# Altium PCB QuarterBridge_RevK.PcbDoc (part 1 of 2)
Units mil, origin at the board's own origin, x right, y up, seen from the top; angles counter-clockwise.
Board outline 3307.09 x 2165.35 mil, 2 copper layers (Top Layer, Bottom Layer), stack 62.992 mil thick; 54 components, 68 nets, 232 pads, 62 vias.
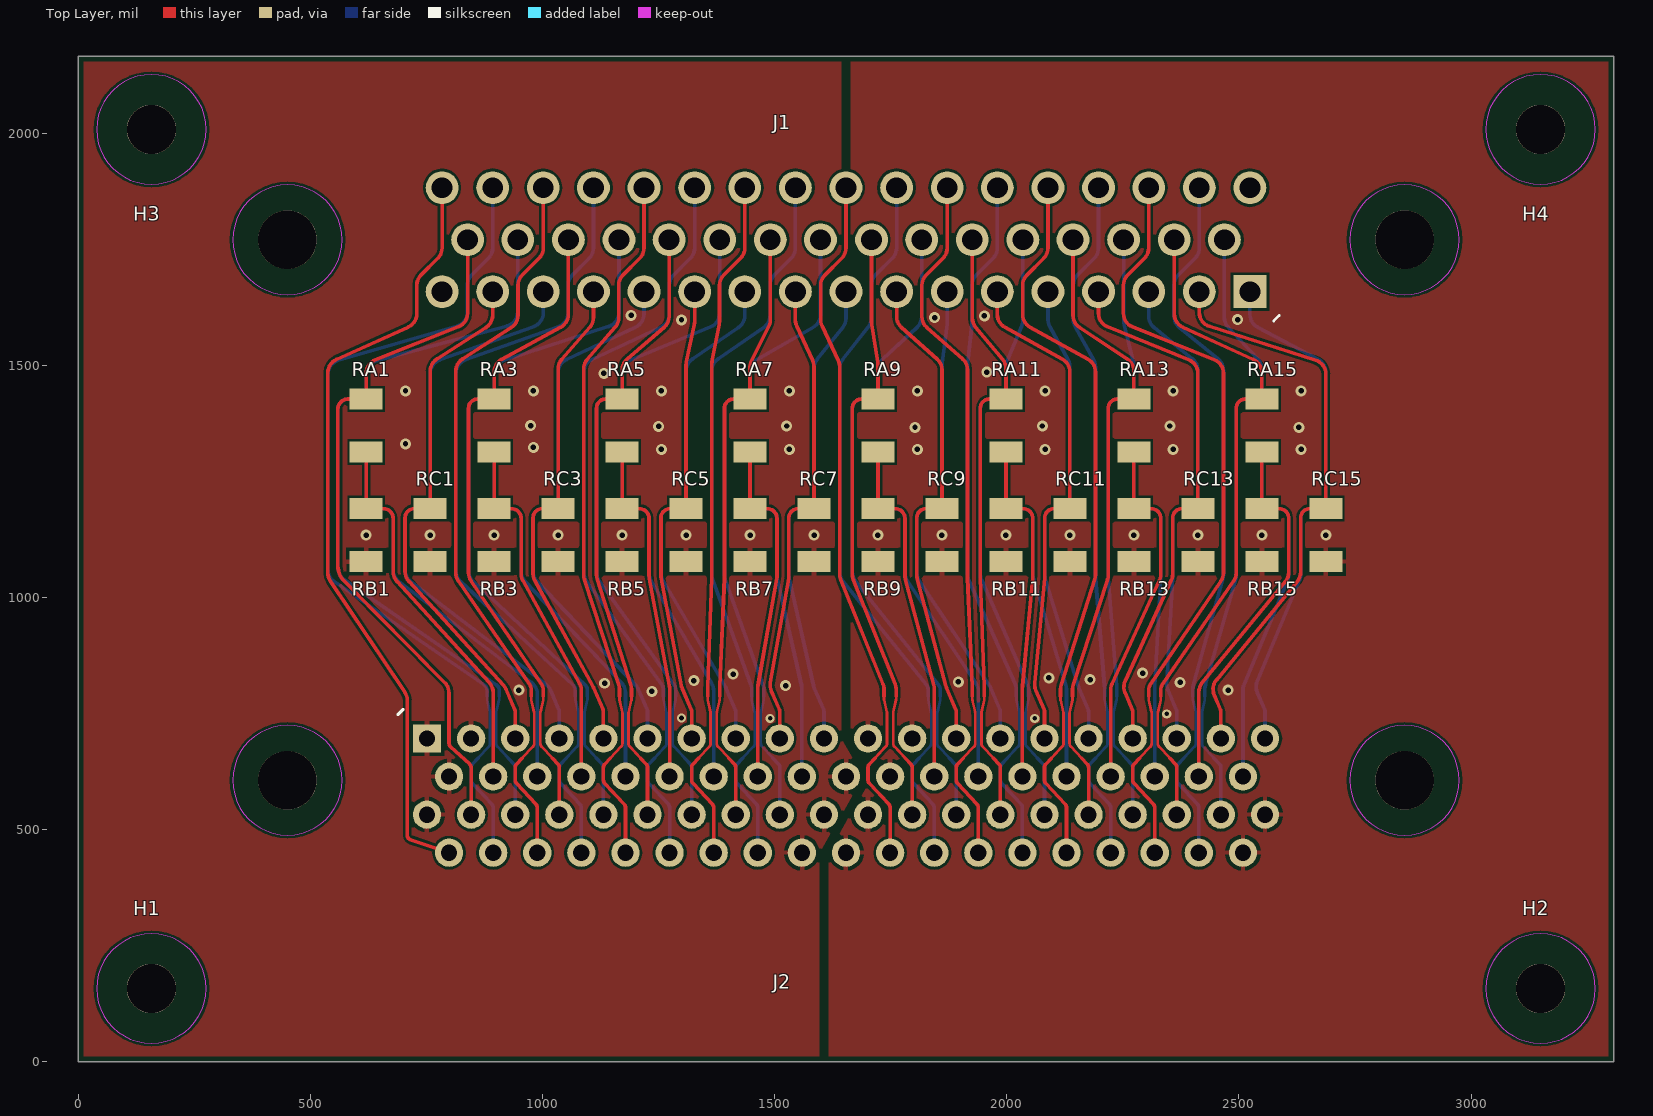
[diagram p0: Top Layer view]
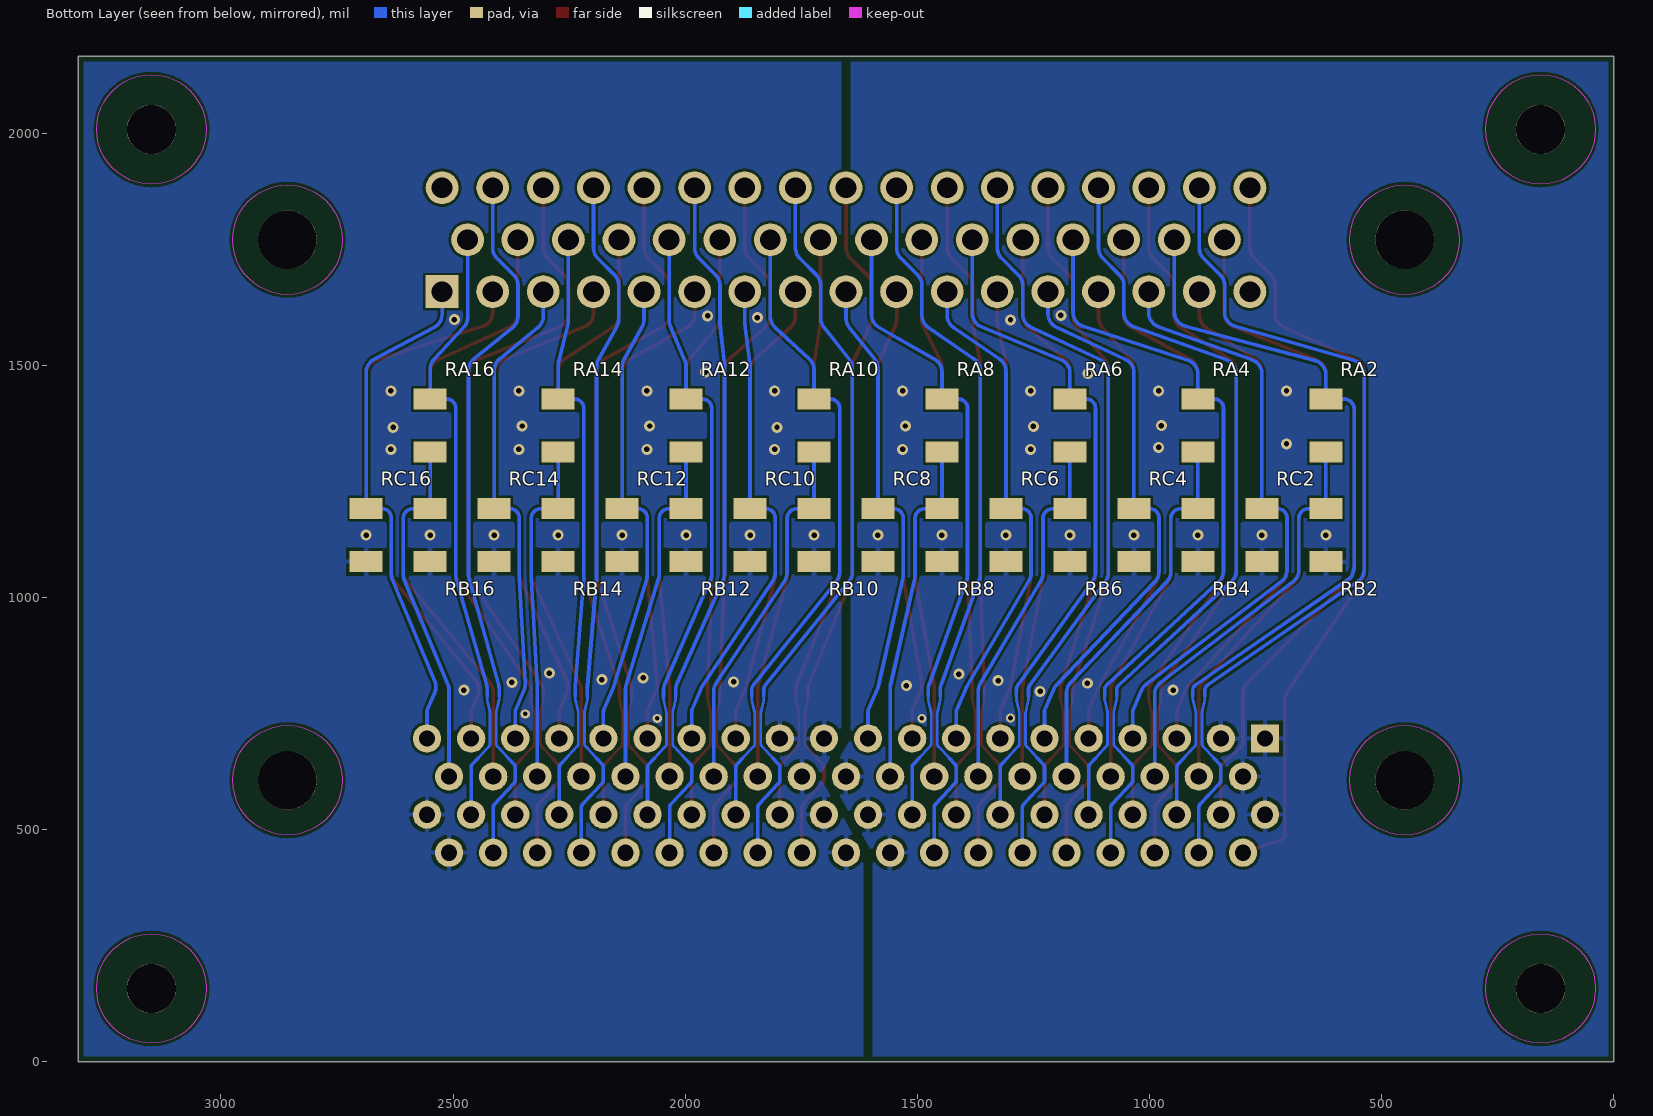
[diagram p1: Bottom Layer view, seen from below]
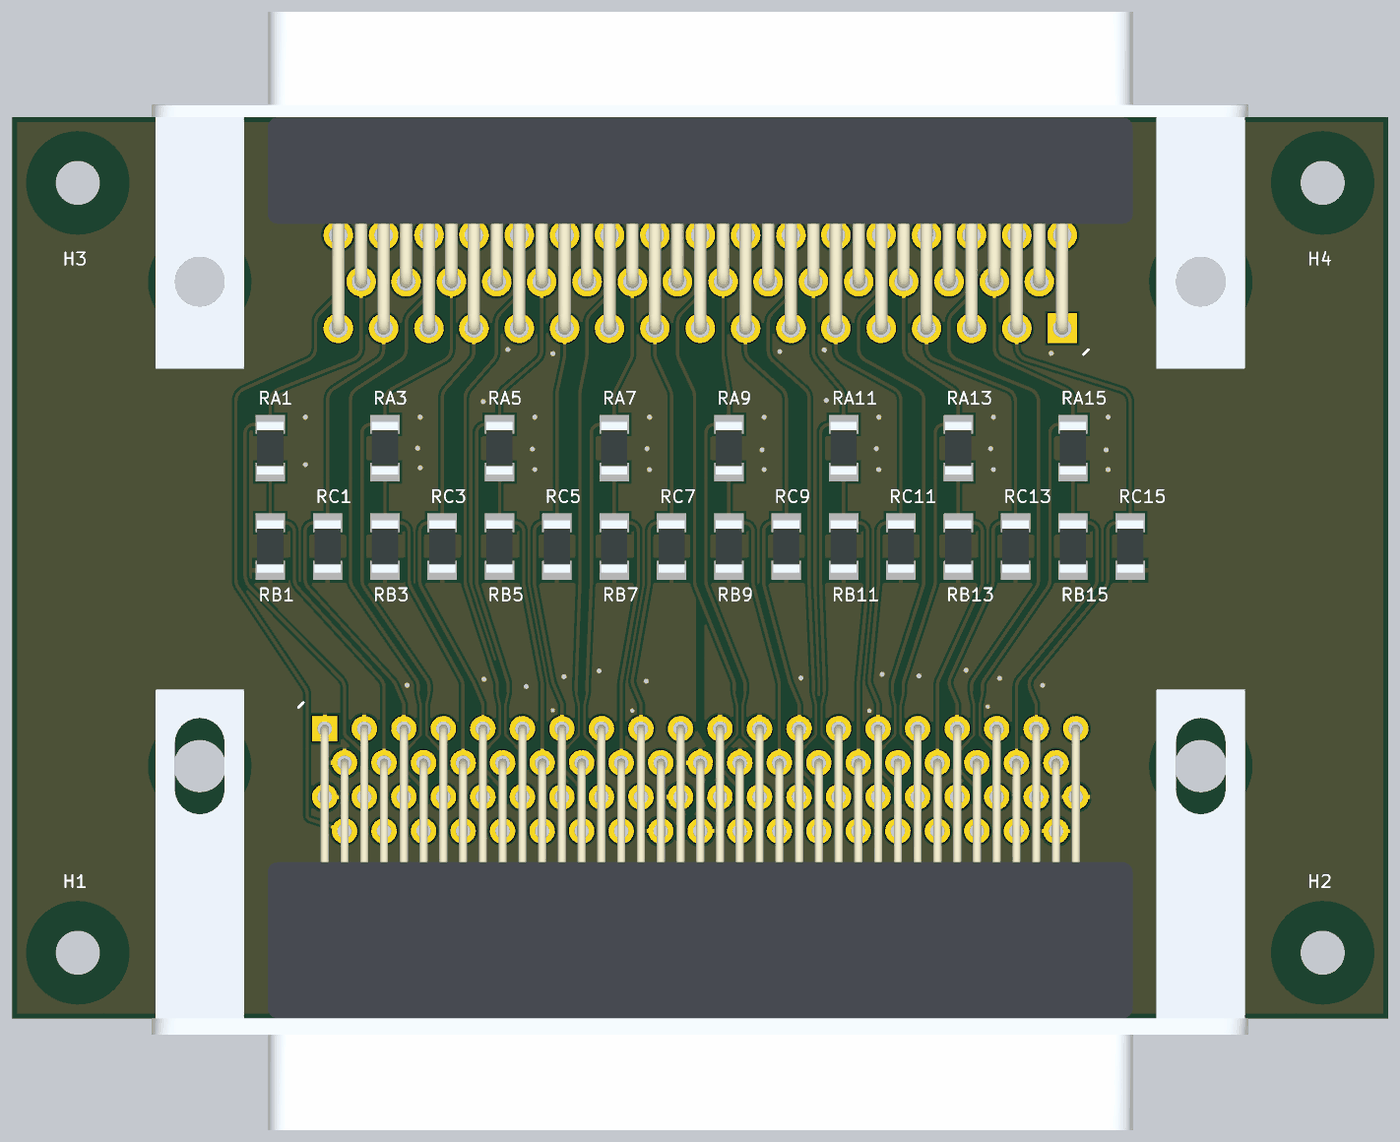
[diagram p3: 3D render of the assembled board from above, using the file's embedded part models]
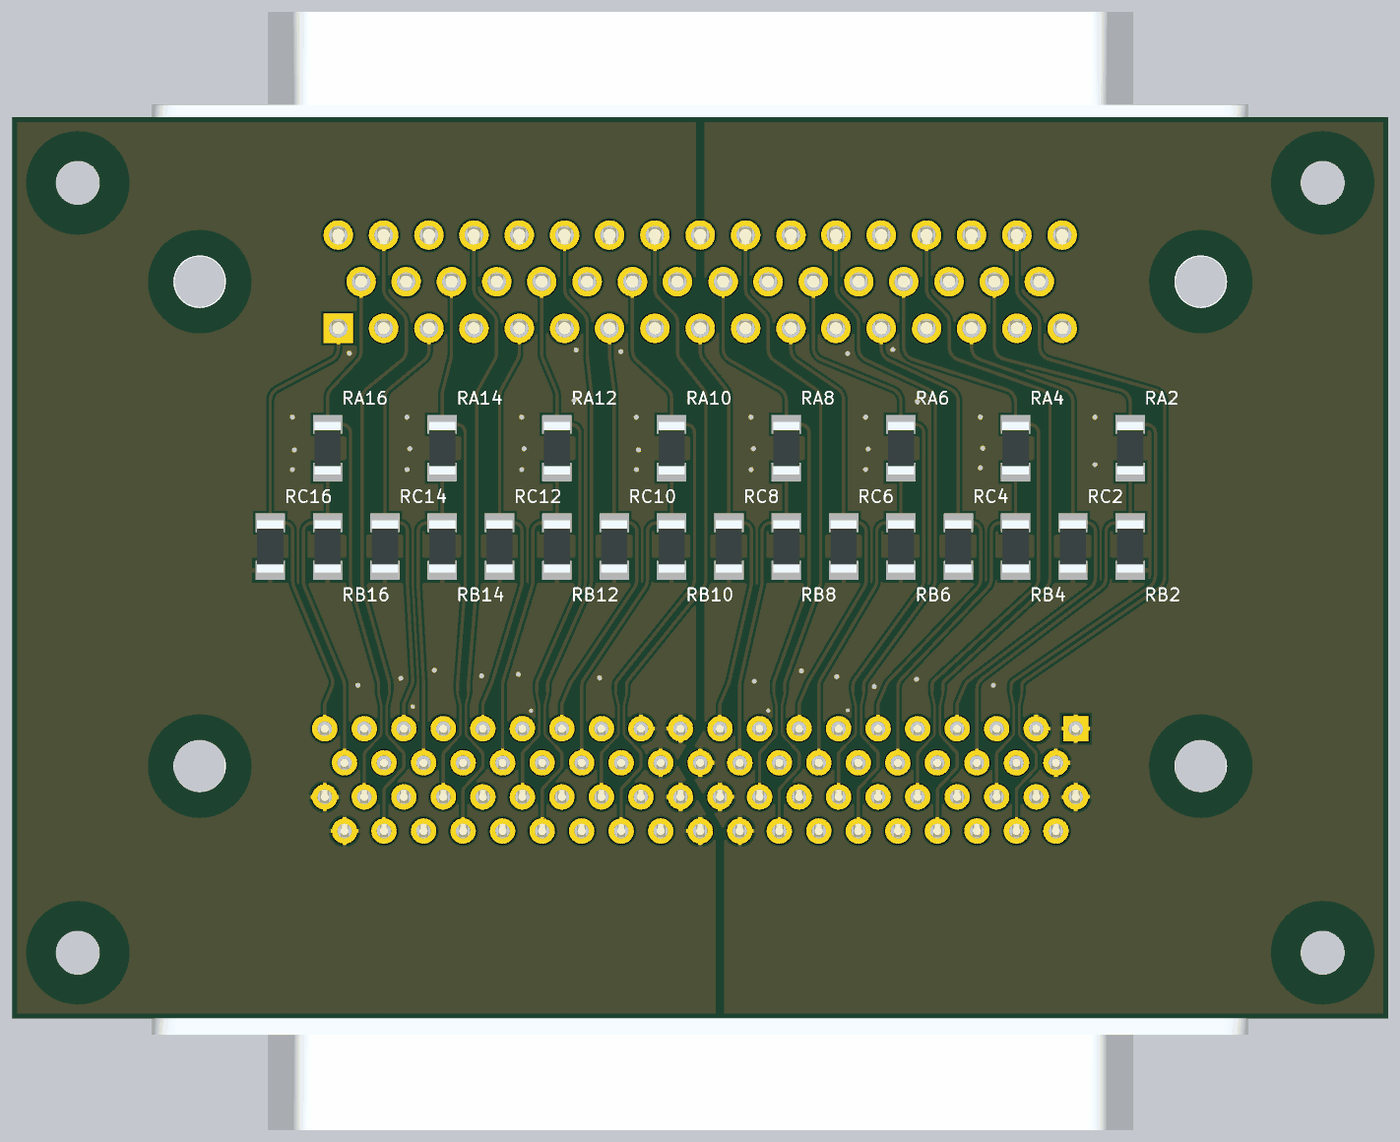
[diagram p4: 3D render of the assembled board from below, using the file's embedded part models]

## Layer stack, top to bottom
Top Solder: solder mask 0.4, Solder Resist, Dk 3.5
Top Layer: signal copper 1.4
Dielectric 1: dielectric 60.1921, FR-4, Dk 4.8
Bottom Layer: signal copper 1.4
Bottom Solder: solder mask 0.4, Solder Resist, Dk 3.5

## Board outline
0,0 3307.09,0 3307.09,2165.35 0,2165.35

## Design rules (kind name [scope] priority, off if disabled: settings)
Clearance [All] p1: gap=5.91 ignorepadtopadclearanceinfootprint=FALSE
HoleSize [All] p1: absolutevalues=TRUE maxlimit=137.8 minlimit=1 maxpercent=80.000 minpercent=20.000
PolygonConnect [Not IsVia vs Not IsVia] p1: connectstyle=Relief reliefconductorwidth=9.84 reliefentries=4 polygonreliefangle="90 Angle" airgapwidth=7.87
PolygonConnect GroundViaDirect [IsVia] p2: connectstyle=Direct reliefconductorwidth=10 reliefentries=4 polygonreliefangle="90 Angle" airgapwidth=10
RoutingVias [All] p1: holewidth=11.81 width=23.62 viastyle="Through Hole" minholewidth=9.84 minwidth=19.68 maxholewidth=11.81 maxwidth=23.62
SolderMaskExpansion [All] p1: expansion=0 istentingtop=FALSE
Width [All] p1: maxlimit=23.62 minlimit=5.91 preferedwidth=7.87
29 further rules are at their usual default settings.

## Components (designator, comment, footprint, x,y, rotation, side; value= is the part's Value field where it differs from the comment)
H1 "Comment" QB_M2P5_NPTH_2P7 157.48,157.48 r0 top
H2 "Comment" QB_M2P5_NPTH_2P7 3149.61,157.48 r0 top
H3 "Comment" QB_M2P5_NPTH_2P7 157.48,2007.87 r0 top
H4 "Comment" QB_M2P5_NPTH_2P7 3149.61,2007.87 r0 top
J1 "M24308/24-29F" QB_ITT_M24308_24_29F_RA_R1 1653.54,2165.35 r180 top
J2 "M24308/24-77F" QB_POS_M24308_24_77F_RA_R1 1653.54,0 r0 top
RA1 "120R" QB_TNPU1206_IPC_R1 620.08,1370.08 r270 top
RA2 "120R" QB_TNPU1206_IPC_R1 620.08,1370.08 r270 bottom
RA3 "120R" QB_TNPU1206_IPC_R1 895.67,1370.08 r270 top
RA4 "120R" QB_TNPU1206_IPC_R1 895.67,1370.08 r270 bottom
RA5 "120R" QB_TNPU1206_IPC_R1 1171.26,1370.08 r270 top
RA6 "120R" QB_TNPU1206_IPC_R1 1171.26,1370.08 r270 bottom
RA7 "120R" QB_TNPU1206_IPC_R1 1446.85,1370.08 r270 top
RA8 "120R" QB_TNPU1206_IPC_R1 1446.85,1370.08 r270 bottom
RA9 "120R" QB_TNPU1206_IPC_R1 1722.44,1370.08 r270 top
RA10 "120R" QB_TNPU1206_IPC_R1 1722.44,1370.08 r270 bottom
RA11 "120R" QB_TNPU1206_IPC_R1 1998.03,1370.08 r270 top
RA12 "120R" QB_TNPU1206_IPC_R1 1998.03,1370.08 r270 bottom
RA13 "120R" QB_TNPU1206_IPC_R1 2273.62,1370.08 r270 top
RA14 "120R" QB_TNPU1206_IPC_R1 2273.62,1370.08 r270 bottom
RA15 "120R" QB_TNPU1206_IPC_R1 2549.21,1370.08 r270 top
RA16 "120R" QB_TNPU1206_IPC_R1 2549.21,1370.08 r270 bottom
RB1 "120R" QB_TNPU1206_IPC_R1 620.08,1133.86 r270 top
RB2 "120R" QB_TNPU1206_IPC_R1 620.08,1133.86 r270 bottom
RB3 "120R" QB_TNPU1206_IPC_R1 895.67,1133.86 r270 top
RB4 "120R" QB_TNPU1206_IPC_R1 895.67,1133.86 r270 bottom
RB5 "120R" QB_TNPU1206_IPC_R1 1171.26,1133.86 r270 top
RB6 "120R" QB_TNPU1206_IPC_R1 1171.26,1133.86 r270 bottom
RB7 "120R" QB_TNPU1206_IPC_R1 1446.85,1133.86 r270 top
RB8 "120R" QB_TNPU1206_IPC_R1 1446.85,1133.86 r270 bottom
RB9 "120R" QB_TNPU1206_IPC_R1 1722.44,1133.86 r270 top
RB10 "120R" QB_TNPU1206_IPC_R1 1722.44,1133.86 r270 bottom
RB11 "120R" QB_TNPU1206_IPC_R1 1998.03,1133.86 r270 top
RB12 "120R" QB_TNPU1206_IPC_R1 1998.03,1133.86 r270 bottom
RB13 "120R" QB_TNPU1206_IPC_R1 2273.62,1133.86 r270 top
RB14 "120R" QB_TNPU1206_IPC_R1 2273.62,1133.86 r270 bottom
RB15 "120R" QB_TNPU1206_IPC_R1 2549.21,1133.86 r270 top
RB16 "120R" QB_TNPU1206_IPC_R1 2549.21,1133.86 r270 bottom
RC1 "120R" QB_TNPU1206_IPC_R1 757.87,1133.86 r90 top
RC2 "120R" QB_TNPU1206_IPC_R1 757.87,1133.86 r90 bottom
RC3 "120R" QB_TNPU1206_IPC_R1 1033.46,1133.86 r90 top
RC4 "120R" QB_TNPU1206_IPC_R1 1033.46,1133.86 r90 bottom
RC5 "120R" QB_TNPU1206_IPC_R1 1309.06,1133.86 r90 top
RC6 "120R" QB_TNPU1206_IPC_R1 1309.06,1133.86 r90 bottom
RC7 "120R" QB_TNPU1206_IPC_R1 1584.65,1133.86 r90 top
RC8 "120R" QB_TNPU1206_IPC_R1 1584.65,1133.86 r90 bottom
RC9 "120R" QB_TNPU1206_IPC_R1 1860.24,1133.86 r90 top
RC10 "120R" QB_TNPU1206_IPC_R1 1860.24,1133.86 r90 bottom
RC11 "120R" QB_TNPU1206_IPC_R1 2135.83,1133.86 r90 top
RC12 "120R" QB_TNPU1206_IPC_R1 2135.83,1133.86 r90 bottom
RC13 "120R" QB_TNPU1206_IPC_R1 2411.42,1133.86 r90 top
RC14 "120R" QB_TNPU1206_IPC_R1 2411.42,1133.86 r90 bottom
RC15 "120R" QB_TNPU1206_IPC_R1 2687.01,1133.86 r90 top
RC16 "120R" QB_TNPU1206_IPC_R1 2687.01,1133.86 r90 bottom

## Footprints (in the part's own frame and the unit in brackets; to place one, negate y for a bottom-side part, rotate by r counter-clockwise, add the part's x,y. Pads: shape width x height; smd on the part's side, far side on the other; paste and mask are expansions set on the pad)
QB_ITT_M24308_24_29F_RA_R1 [mm] "Rev E physical trial; rear flange origin; mating -Y; NPTH mounting isolated from AGND"
  rect 1.8x1.8 hole 1.14 paste-2539.97 mask+0.075: 1(-22.098,12.878)
  round 1.8 hole 1.14 paste-2539.97 mask+0.075: 2(-19.329,12.878) 3(-16.561,12.878) 4(-13.818,12.878) 5(-11.049,12.878) 6(-8.28,12.878) 7(-5.537,12.878) 8(-2.769,12.878) 9(0,12.878) 10(2.769,12.878) 11(5.537,12.878) 12(8.28,12.878) 13(11.049,12.878) 14(13.818,12.878) 15(16.561,12.878) 16(19.329,12.878) 17(22.098,12.878) 18(-20.701,10.033) 19(-17.958,10.033) 20(-15.189,10.033) 21(-12.421,10.033) 22(-9.677,10.033) 23(-6.909,10.033) 24(-4.14,10.033) 25(-1.397,10.033) 26(1.397,10.033) 27(4.14,10.033) 28(6.909,10.033) 29(9.677,10.033) 30(12.421,10.033) 31(15.189,10.033) 32(17.958,10.033) 33(20.701,10.033) 34(-22.098,7.188) 35(-19.329,7.188) 36(-16.561,7.188) 37(-13.818,7.188) 38(-11.049,7.188) 39(-8.28,7.188) 40(-5.537,7.188) 41(-2.769,7.188) 42(0,7.188) 43(2.769,7.188) 44(5.537,7.188) 45(8.28,7.188) 46(11.049,7.188) 47(13.818,7.188) 48(16.561,7.188) 49(19.329,7.188) 50(22.098,7.188)
  round 3.2 hole 3.2 unplated paste-2539.97 mask+0: ""(-30.556,10.033) ""(30.556,10.033)
  silkscreen extent -23.7,14.18 -23.4,14.48, body extent -33.47,-6.44 33.47,15.34, height 15.09
QB_M2P5_NPTH_2P7 [mm] "Rev E physical trial; rear flange origin; mating -Y; NPTH mounting isolated from AGND"
  round 2.7 hole 2.7 unplated paste-2539.97 mask+0: ""(0,0)
QB_POS_M24308_24_77F_RA_R1 [mm] "Rev E physical trial; rear flange origin; mating -Y; NPTH mounting isolated from AGND"
  rect 1.55x1.55 hole 0.89 paste-2539.97 mask+0.075: 1(-22.924,17.678)
  round 1.55 hole 0.89 paste-2539.97 mask+0.075: 2(-20.511,17.678) 3(-18.098,17.678) 4(-15.684,17.678) 5(-13.271,17.678) 6(-10.858,17.678) 7(-8.445,17.678) 8(-6.032,17.678) 9(-3.619,17.678) 10(-1.206,17.678) 11(1.206,17.678) 12(3.619,17.678) 13(6.032,17.678) 14(8.445,17.678) 15(10.858,17.678) 16(13.271,17.678) 17(15.684,17.678) 18(18.097,17.678) 19(20.51,17.678) 20(22.923,17.678) 21(-21.717,15.596) 22(-19.304,15.596) 23(-16.891,15.596) 24(-14.478,15.596) 25(-12.065,15.596) 26(-9.652,15.596) 27(-7.239,15.596) 28(-4.826,15.596) 29(-2.413,15.596) 30(0,15.596) 31(2.413,15.596) 32(4.826,15.596) 33(7.239,15.596) 34(9.652,15.596) 35(12.065,15.596) 36(14.478,15.596) 37(16.891,15.596) 38(19.304,15.596) 39(21.717,15.596) 40(-22.924,13.513) 41(-20.511,13.513) 42(-18.098,13.513) 43(-15.684,13.513) 44(-13.271,13.513) 45(-10.858,13.513) 46(-8.445,13.513) 47(-6.032,13.513) 48(-3.619,13.513) 49(-1.206,13.513) 50(1.206,13.513) 51(3.619,13.513) 52(6.032,13.513) 53(8.445,13.513) 54(10.858,13.513) 55(13.271,13.513) 56(15.684,13.513) 57(18.097,13.513) 58(20.51,13.513) 59(22.923,13.513) 60(-21.717,11.43) 61(-19.304,11.43) 62(-16.891,11.43) 63(-14.478,11.43) 64(-12.065,11.43) 65(-9.652,11.43) 66(-7.239,11.43) 67(-4.826,11.43) 68(-2.413,11.43) 69(0,11.43) 70(2.413,11.43) 71(4.826,11.43) 72(7.239,11.43) 73(9.652,11.43) 74(12.065,11.43) 75(14.478,11.43) 76(16.891,11.43) 77(19.304,11.43) 78(21.717,11.43)
  round 3.2 hole 3.2 unplated paste-2539.97 mask+0: ""(-30.556,15.392) ""(30.556,15.392)
  silkscreen extent -24.52,18.98 -24.22,19.28, body extent -33.47,-6.83 33.47,20.07, height 15.37
QB_TNPU1206_IPC_R1 [mm] "Vishay doc28950 p1 IPC7351 reflow 1206; G1.75 Y1.15 X1.80 Z4.05 mm"
  rect 1.15x1.8 smd: 1(-1.45,0) 2(1.45,0)
  body extent -1.6,-0.8 1.6,0.8, height 0.55

## Part data
H1 H2 H3 H4: library part QB_M2P5_NPTH_2P7
J1: library part MIL_DSUB50_PIN_RA_24_29F
J2: library part MIL_DSUB78_PIN_RA_24_77F
RA1 RA2 RA3 RA4 RA5 RA6 RA7 RA8 RA9 RA10 RA11 RA12 RA13 RA14 RA15 RA16 RB1 RB2 RB3 RB4 RB5 RB6 RB7 RB8 RB9 RB10 RB11 RB12 RB13 RB14 RB15 RB16 RC1 RC2 RC3 RC4 RC5 RC6 RC7 RC8 RC9 RC10 RC11 RC12 RC13 RC14 RC15 RC16: library part TNPU1206120RAZEN00_ANSI

## Via types
v1: diameter 23.62, hole 11.81, Top Layer to Bottom Layer, tented both sides, 58 vias
v2: diameter 19.68, hole 9.84, Top Layer to Bottom Layer, tented both sides, 4 vias

## Nets (pads, with @x,y where several pads share a name; then routed paths per layer and width w, separated by ;. In a path a pad name is that pad's centre, name@x,y a point inside that pad or via, vN(x,y) a via of type N, cw(c..) or ccw(c..) an arc to the next point about the centre after c; other vN are vias at no path point)
AGND_A: J2.1 J2.2 J2.21 J2.30 J2.40 J2.49 J2.68 RB1.2 RB2.2 RB3.2 RB4.2 RB5.2 RB6.2 RB7.2 RB8.2 RC1.1 RC2.1 RC3.1 RC4.1 RC5.1 RC6.1 RC7.1 RC8.1
  other v1: 1235.24,797.24 948.82,800.2 1523.62,810.04 1133.86,814.96 1325.79,820.87 1410.43,834.65 620.08,1133.86 757.87,1133.86 895.67,1133.86 1033.46,1133.86 1171.26,1133.86 1309.06,1133.86 1446.85,1133.86 1584.65,1133.86 1255.91,1318.9 1531.5,1318.9 980.32,1322.83 704.72,1330.71 1250,1368.11 1525.59,1369.09 974.41,1370.08 704.72,1444.88 980.32,1444.88 1255.91,1444.88 1531.5,1444.88 1131.89,1482.28 1299.21,1597.44 1190.94,1607.28
  other v2: 1490.16,739.17 1299.21,740.16
AGND_B: J2.11 J2.12 J2.31 J2.50 J2.59 J2.69 J2.78 RB9.2 RB10.2 RB11.2 RB12.2 RB13.2 RB14.2 RB15.2 RB16.2 RC9.1 RC10.1 RC11.1 RC12.1 RC13.1 RC14.1 RC15.1 RC16.1
  other v1: 2476.38,800.2 2373.03,816.93 1895.67,817.91 2179.13,822.83 2090.55,826.77 2292.32,836.61 1722.44,1133.86 1860.24,1133.86 1998.03,1133.86 2135.83,1133.86 2273.62,1133.86 2411.42,1133.86 2549.21,1133.86 2687.01,1133.86 1807.09,1318.9 2082.68,1318.9 2358.27,1318.9 2633.86,1318.9 1802.17,1366.14 2628.94,1366.14 2076.77,1369.09 2351.38,1369.09 1807.09,1444.88 2082.68,1444.88 2358.27,1444.88 2633.86,1444.88 1956.69,1485.24 2497.05,1598.43 1844.49,1602.36 1951.77,1606.3
  other v2: 2060.04,739.17 2344.49,749.02
NetJ1_17: J1.17
NetJ1_34: J1.34
P+_01: J1.33 J2.41 RA1.1 | length 1543.1
  Top Layer w7.87: J1.33@838.54,1770.35 838.54,1611.95 cw(c807.05,1611.95) 818.66,1582.67 639.97,1511.82 ccw(c651.57,1482.54) 620.08,1482.54 RA1.1@620.08,1427.17 581.02,1427.17 ccw(c581.02,1405.2) 559.06,1405.2 559.06,1067.61 ccw(c590.55,1067.61) 560.38,1058.56 563.31,1048.8 ccw(c585.36,1055.41) 568.99,1039.23 789.44,816.29 cw(c767.05,794.14) 798.54,794.14 798.54,685.45 ccw(c808.39,685.45) 801.75,678.17 842.83,640.72 cw(c836.2,633.45) 846.04,633.45 J2.41@846.04,532
P+_02: J1.32 J2.42 RA2.1 | length 1721.3
  Bottom Layer w5.91: 906.54,787.4 906.54,780.65 cw(c896.69,780.65) 906.28,778.44 900.44,753.06 ccw(c910.03,750.85) 900.19,750.85 900.19,685.01 ccw(c910.03,685.01) 902.87,678.26 926.19,653.54
  Bottom Layer w7.87: 906.54,787.4 906.54,800 ccw(c893.02,800) 900.71,811.12 569.68,1040.05 cw(c578.98,1053.5) 563.31,1048.8 560.38,1058.56 cw(c590.55,1067.61) 559.06,1067.61 559.06,1405.2 cw(c581.02,1405.2) 581.02,1427.17 RA2.1@620.08,1427.17 620.08,1479.71 cw(c651.57,1479.71) 643.5,1510.15 923.12,1584.34 ccw(c915.05,1614.78) 946.54,1614.78 J1.32@946.54,1770.35 ; 926.19,653.54 938.36,640.64 cw(c931.2,633.89) 941.04,633.89 J2.42@941.04,532
P+_03: J1.31 J2.43 RA3.1 | length 1437.6
  Top Layer w5.91: 1001.54,787.4 1001.54,780.65 cw(c991.69,780.65) 1001.28,778.44 995.44,753.06 ccw(c1005.03,750.85) 995.19,750.85 995.19,685.01 ccw(c1005.03,685.01) 997.87,678.26 1021.19,653.54
  Top Layer w7.87: 1001.54,787.4 1001.54,800 ccw(c978.55,800) 997.54,812.94 846.02,1035.28 cw(c872.05,1053.02) 840.55,1053.02 840.55,1407.32 cw(c860.39,1407.32) 860.39,1427.17 RA3.1@895.67,1427.17 895.67,1485.18 cw(c927.17,1485.18) 912.16,1512.87 1039.05,1581.62 ccw(c1024.05,1609.31) 1055.54,1609.31 J1.31@1055.54,1770.35 ; 1021.19,653.54 1033.36,640.64 cw(c1026.2,633.89) 1036.04,633.89 J2.43@1036.04,532
P+_04: J1.30 J2.44 RA4.1 | length 1594.2
  Bottom Layer w5.91: 1096.54,787.4 1096.54,780.65 cw(c1086.69,780.65) 1096.28,778.44 1090.44,753.06 ccw(c1100.03,750.85) 1090.19,750.85 1090.19,685.01 ccw(c1100.03,685.01) 1092.87,678.26 1116.19,653.54
  Bottom Layer w7.87: 1096.54,787.4 1096.54,800 ccw(c1080.35,800) 1091.33,811.89 850.69,1033.95 cw(c872.05,1057.1) 840.55,1057.1 840.55,1407.32 cw(c860.39,1407.32) 860.39,1427.17 RA4.1@895.67,1427.17 895.67,1480.99 cw(c927.17,1480.99) 917.51,1510.97 1142.7,1583.52 ccw(c1133.05,1613.5) 1164.54,1613.5 J1.30@1164.54,1770.35 ; 1116.19,653.54 1128.36,640.64 cw(c1121.2,633.89) 1131.04,633.89 J2.44@1131.04,532
P+_05: J1.29 J2.45 RA5.1 | length 1355.7
  Top Layer w5.91: 1191.54,787.4 1191.54,780.65 cw(c1181.69,780.65) 1191.28,778.44 1185.44,753.06 ccw(c1195.03,750.85) 1185.19,750.85 1185.19,685.01 ccw(c1195.03,685.01) 1187.87,678.26 1211.19,653.54
  Top Layer w7.87: 1191.54,787.4 1191.54,802.18 ccw(c1160.04,802.18) 1190.04,811.76 1117.63,1038.63 cw(c1147.64,1048.21) 1116.14,1048.21 1116.14,1407.32 cw(c1135.98,1407.32) 1135.98,1427.17 RA5.1@1171.26,1427.17 1171.26,1489.43 cw(c1202.76,1489.43) 1182.29,1513.37 1261.52,1581.12 ccw(c1241.05,1605.06) 1272.54,1605.06 J1.29@1272.54,1770.35 ; 1211.19,653.54 1223.36,640.64 cw(c1216.2,633.89) 1226.04,633.89 J2.45@1226.04,532
P+_06: J1.28 J2.46 RA6.1 | length 1485.8
  Bottom Layer w5.91: 1286.54,787.4 1286.54,780.65 cw(c1276.69,780.65) 1286.28,778.44 1280.44,753.06 ccw(c1290.03,750.85) 1280.19,750.85 1280.19,685.01 ccw(c1290.03,685.01) 1282.87,678.26 1306.19,653.54
  Bottom Layer w7.87: 1286.54,787.4 1286.54,800 ccw(c1264.6,800) 1282.39,812.83 1122.09,1035.06 cw(c1147.64,1053.48) 1116.14,1053.48 1116.14,1407.32 cw(c1135.98,1407.32) 1135.98,1427.17 RA6.1@1171.26,1427.17 1171.26,1482.85 cw(c1202.76,1482.85) 1190.76,1511.97 1362.04,1582.52 ccw(c1350.05,1611.64) 1381.54,1611.64 J1.28@1381.54,1770.35 ; 1306.19,653.54 1318.36,640.64 cw(c1311.2,633.89) 1321.04,633.89 J2.46@1321.04,532
P+_07: J1.27 J2.47 RA7.1 | length 1311.2
  Top Layer w5.91: 1381.54,787.4 1381.54,780.65 cw(c1371.69,780.65) 1381.28,778.44 1375.44,753.06 ccw(c1385.03,750.85) 1375.19,750.85 1375.19,685.01 ccw(c1385.03,685.01) 1377.87,678.26 1401.19,653.54
  Top Layer w7.87: 1381.54,787.4 1381.54,806.41 cw(c1413.03,806.41) 1381.56,807.77 1391.7,1042.63 ccw(c1360.24,1043.99) 1391.73,1043.99 1391.73,1407.32 cw(c1411.57,1407.32) 1411.57,1427.17 RA7.1@1446.85,1427.17 1446.85,1496.44 cw(c1478.35,1496.44) 1450.23,1510.63 1487.17,1583.86 ccw(c1459.05,1598.05) 1490.54,1598.05 J1.27@1490.54,1770.35 ; 1401.19,653.54 1413.36,640.64 cw(c1406.2,633.89) 1416.04,633.89 J2.47@1416.04,532
P+_08: J1.26 J2.48 RA8.1 | length 1396.9
  Bottom Layer w5.91: 1476.54,787.4 1476.54,780.65 cw(c1466.69,780.65) 1476.28,778.44 1470.44,753.06 ccw(c1480.03,750.85) 1470.19,750.85 1470.19,685.01 ccw(c1480.03,685.01) 1472.87,678.26 1496.19,653.54
  Bottom Layer w7.87: 1476.54,787.4 1476.54,801.6 ccw(c1445.04,801.6) 1474.68,812.25 1393.58,1038.15 cw(c1423.23,1048.79) 1391.73,1048.79 1391.73,1407.32 cw(c1411.57,1407.32) 1411.57,1427.17 RA8.1@1446.85,1427.17 1446.85,1485.65 cw(c1478.35,1485.65) 1462.73,1513 1582.66,1581.48 ccw(c1567.05,1608.84) 1598.54,1608.84 J1.26@1598.54,1770.35 ; 1496.19,653.54 1508.36,640.64 cw(c1501.2,633.89) 1511.04,633.89 J2.48@1511.04,532
P+_09: J1.25 J2.51 RA9.1 | length 1320
  Top Layer w5.91: 1761.54,787.4 1761.54,780.65 cw(c1751.69,780.65) 1761.28,778.44 1755.44,753.06 ccw(c1765.03,750.85) 1755.19,750.85 1755.19,685.01 ccw(c1765.03,685.01) 1757.87,678.26 1781.19,653.54
  Top Layer w7.87: J1.25@1708.54,1770.35 1708.54,1593.06 ccw(c1740.04,1593.06) 1708.94,1588.07 1722.04,1506.42 cw(c1690.94,1501.43) 1722.44,1501.43 RA9.1@1722.44,1427.17 1687.17,1427.17 ccw(c1687.17,1407.32) 1667.32,1407.32 1667.32,1049.36 ccw(c1698.82,1049.36) 1669.56,1037.69 1759.29,812.71 cw(c1730.04,801.04) 1761.54,801.04 1761.54,787.4 ; 1781.19,653.54 1793.36,640.64 cw(c1786.2,633.89) 1796.04,633.89 J2.51@1796.04,532
P+_10: J1.24 J2.52 RA10.1 | length 1404.3
  Bottom Layer w5.91: 1856.54,787.4 1856.54,780.65 cw(c1846.69,780.65) 1856.28,778.44 1850.44,753.06 ccw(c1860.03,750.85) 1850.19,750.85 1850.19,685.01 ccw(c1860.03,685.01) 1852.87,678.26 1876.19,653.54
  Bottom Layer w7.87: J1.24@1816.54,1770.35 1816.54,1604.37 cw(c1785.05,1604.37) 1806.38,1581.19 1732.61,1513.29 ccw(c1753.94,1490.12) 1722.44,1490.12 RA10.1@1722.44,1427.17 1687.17,1427.17 ccw(c1687.17,1407.32) 1667.32,1407.32 1667.32,1054.37 ccw(c1698.82,1054.37) 1674.24,1034.68 1852.11,812.62 cw(c1836.35,800) 1856.54,800 1856.54,787.4 ; 1876.19,653.54 1888.36,640.64 cw(c1881.2,633.89) 1891.04,633.89 J2.52@1891.04,532
P+_11: J1.23 J2.53 RA11.1 | length 1325.8
  Top Layer w5.91: 1951.54,787.4 1951.54,780.65 cw(c1941.69,780.65) 1951.28,778.44 1945.44,753.06 ccw(c1955.03,750.85) 1945.19,750.85 1945.19,685.01 ccw(c1955.03,685.01) 1947.87,678.26 1971.19,653.54
  Top Layer w7.87: J1.23@1925.54,1770.35 1925.54,1601.99 ccw(c1957.04,1601.99) 1932.89,1581.78 1990.69,1512.71 cw(c1966.54,1492.5) 1998.03,1492.5 RA11.1@1998.03,1427.17 1962.76,1427.17 ccw(c1962.76,1407.32) 1942.91,1407.32 1942.91,1043.88 ccw(c1974.41,1043.88) 1942.93,1042.73 1951.51,807.66 cw(c1920.04,806.51) 1951.54,806.51 1951.54,787.4 ; 1971.19,653.54 1983.36,640.64 cw(c1976.2,633.89) 1986.04,633.89 J2.53@1986.04,532
P+_12: J1.22 J2.54 RA12.1 | length 1329.5
  Bottom Layer w5.91: 2046.54,787.4 2046.54,780.65 cw(c2036.69,780.65) 2046.28,778.44 2040.44,753.06 ccw(c2050.03,750.85) 2040.19,750.85 2040.19,685.01 ccw(c2050.03,685.01) 2042.87,678.26 2066.19,653.54
  Bottom Layer w7.87: J1.22@2034.54,1770.35 2034.54,1596.92 cw(c2003.05,1596.92) 2032.07,1584.68 2000.5,1509.8 ccw(c2029.53,1497.57) 1998.03,1497.57 RA12.1@1998.03,1427.17 1962.76,1427.17 ccw(c1962.76,1407.32) 1942.91,1407.32 1942.91,1049.91 ccw(c1974.41,1049.91) 1945.57,1037.26 2043.88,813.13 cw(c2015.04,800.48) 2046.54,800.48 2046.54,787.4 ; 2066.19,653.54 2078.36,640.64 cw(c2071.2,633.89) 2081.04,633.89 J2.54@2081.04,532
P+_13: J1.21 J2.55 RA13.1 | length 1378.1
  Top Layer w5.91: 2141.54,787.4 2141.54,780.65 cw(c2131.69,780.65) 2141.28,778.44 2135.44,753.06 ccw(c2145.03,750.85) 2135.19,750.85 2135.19,685.01 ccw(c2145.03,685.01) 2137.87,678.26 2161.19,653.54
  Top Layer w7.87: 2141.54,787.4 2141.54,802.08 cw(c2173.03,802.08) 2143.08,811.84 2216.95,1038.55 ccw(c2187.01,1048.31) 2218.5,1048.31 2218.5,1407.32 cw(c2238.35,1407.32) 2238.35,1427.17 RA13.1@2273.62,1427.17 2273.62,1487 ccw(c2242.13,1487) 2259.49,1513.28 2156.68,1581.21 cw(c2174.04,1607.49) 2142.54,1607.49 J1.21@2142.54,1770.35 ; 2161.19,653.54 2173.36,640.64 cw(c2166.2,633.89) 2176.04,633.89 J2.55@2176.04,532
P+_14: J1.20 J2.56 RA14.1 | length 1304.5
  Bottom Layer w5.91: 2236.54,787.4 2236.54,780.65 cw(c2226.69,780.65) 2236.28,778.44 2230.44,753.06 ccw(c2240.03,750.85) 2230.19,750.85 2230.19,685.01 ccw(c2240.03,685.01) 2232.87,678.26 2256.19,653.54
  Bottom Layer w7.87: 2236.54,787.4 2236.54,805.89 ccw(c2205.04,805.89) 2236.44,808.28 2218.6,1042.11 cw(c2250,1044.51) 2218.5,1044.51 2218.5,1407.32 cw(c2238.35,1407.32) 2238.35,1427.17 RA14.1@2273.62,1427.17 2273.62,1499.99 ccw(c2242.13,1499.99) 2272.65,1507.77 2252.52,1586.72 cw(c2283.04,1594.5) 2251.54,1594.5 J1.20@2251.54,1770.35 ; 2256.19,653.54 2268.36,640.64 cw(c2261.2,633.89) 2271.04,633.89 J2.56@2271.04,532
P+_15: J1.19 J2.57 RA15.1 | length 1462.7
  Top Layer w5.91: 2331.54,787.4 2331.54,780.65 cw(c2321.69,780.65) 2331.28,778.44 2325.44,753.06 ccw(c2335.03,750.85) 2325.19,750.85 2325.19,685.01 ccw(c2335.03,685.01) 2327.87,678.26 2351.19,653.54
  Top Layer w7.87: 2331.54,787.4 2331.54,800 cw(c2354.33,800) 2335.55,812.92 2488.54,1035.24 ccw(c2462.6,1053.1) 2494.09,1053.1 2494.09,1407.32 cw(c2513.94,1407.32) 2513.94,1427.17 RA15.1@2549.21,1427.17 2549.21,1483.74 ccw(c2517.72,1483.74) 2530.86,1512.36 2378.9,1582.12 cw(c2392.04,1610.75) 2360.54,1610.75 J1.19@2360.54,1770.35 ; 2351.19,653.54 2363.36,640.64 cw(c2356.2,633.89) 2366.04,633.89 J2.57@2366.04,532
P+_16: J1.18 J2.58 RA16.1 | length 1339.9
  Bottom Layer w5.91: 2426.54,787.4 2426.54,780.65 cw(c2416.69,780.65) 2426.28,778.44 2420.44,753.06 ccw(c2430.03,750.85) 2420.19,750.85 2420.19,685.01 ccw(c2430.03,685.01) 2422.87,678.26 2446.19,653.54
  Bottom Layer w7.87: 2426.54,787.4 2426.54,802.67 cw(c2458.03,802.67) 2427.75,811.33 2492.88,1039.06 ccw(c2462.6,1047.72) 2494.09,1047.72 2494.09,1407.32 cw(c2513.94,1407.32) 2513.94,1427.17 RA16.1@2549.21,1427.17 2549.21,1491.54 ccw(c2517.72,1491.54) 2540.76,1513.01 2476.99,1581.48 cw(c2500.04,1602.95) 2468.54,1602.95 J1.18@2468.54,1770.35 ; 2446.19,653.54 2458.36,640.64 cw(c2451.2,633.89) 2461.04,633.89 J2.58@2461.04,532
PS+_01: J1.50 J2.60 | length 1680.4
  Top Layer w7.87: J1.50@783.54,1882.35 783.54,1752.59 cw(c752.05,1752.59) 774.32,1730.31 738.27,1694.26 ccw(c760.54,1671.99) 729.04,1671.99 729.04,1610.88 cw(c697.55,1610.88) 710.52,1582.18 555.93,1512.31 ccw(c568.9,1483.61) 537.4,1483.61 537.4,1052.87 ccw(c568.9,1052.87) 542.72,1035.36 703.34,795.35 cw(c677.17,777.83) 708.66,777.83 708.66,487.38 ccw(c718.5,487.38) 715.36,478.06 J2.60@798.54,450
PS+_02: J1.49 J2.61 | length 1875.7
  Bottom Layer w5.91: 860.9,653.54 884.21,678.26 ccw(c877.05,685.01) 886.9,685.01 886.9,750.85 ccw(c877.05,750.85) 886.65,753.06 880.8,778.44 cw(c890.39,780.65) 880.55,780.65 880.55,787.4
  Bottom Layer w7.87: 860.9,653.54 848.73,640.64 ccw(c855.89,633.89) 846.04,633.89 846.04,606.23 ccw(c855.89,606.23) 848.67,599.53 890.92,554.01 cw(c883.7,547.32) 893.54,547.32 J2.61@893.54,450 ; 880.55,787.4 880.55,800 ccw(c867.07,800) 874.71,811.1 551.04,1033.92 cw(c568.9,1059.86) 537.4,1059.86 537.4,1480.23 cw(c568.9,1480.23) 560.18,1510.5 815.27,1583.99 ccw(c806.55,1614.25) 838.04,1614.25 838.04,1671.99 cw(c869.54,1671.99) 847.27,1694.26 883.32,1730.31 ccw(c861.05,1752.59) 892.54,1752.59 J1.49@892.54,1882.35
PS+_03: J1.48 J2.62 | length 1603
  Top Layer w5.91: 955.9,653.54 979.21,678.26 ccw(c972.05,685.01) 981.9,685.01 981.9,750.85 ccw(c972.05,750.85) 981.65,753.06 975.8,778.44 cw(c985.39,780.65) 975.55,780.65 975.55,787.4
  Top Layer w7.87: 955.9,653.54 943.73,640.64 ccw(c950.89,633.89) 941.04,633.89 941.04,606.23 ccw(c950.89,606.23) 943.67,599.53 985.92,554.01 cw(c978.7,547.32) 988.54,547.32 J2.62@988.54,450 ; 975.55,787.4 975.55,800 ccw(c952.75,800) 971.53,812.92 818.54,1035.24 cw(c844.49,1053.1) 812.99,1053.1 812.99,1486.79 cw(c844.49,1486.79) 827.4,1513.24 932.64,1581.24 ccw(c915.55,1607.7) 947.04,1607.7 947.04,1671.99 cw(c978.54,1671.99) 956.27,1694.26 992.32,1730.31 ccw(c970.05,1752.59) 1001.54,1752.59 J1.48@1001.54,1882.35
PS+_04: J1.47 J2.63 | length 1756.2
  Bottom Layer w5.91: 1050.9,653.54 1074.21,678.26 ccw(c1067.05,685.01) 1076.9,685.01 1076.9,750.85 ccw(c1067.05,750.85) 1076.65,753.06 1070.8,778.44 cw(c1080.39,780.65) 1070.55,780.65 1070.55,787.4
  Bottom Layer w7.87: 1050.9,653.54 1038.73,640.64 ccw(c1045.89,633.89) 1036.04,633.89 1036.04,606.23 ccw(c1045.89,606.23) 1038.67,599.53 1080.92,554.01 cw(c1073.7,547.32) 1083.54,547.32 J2.63@1083.54,450 ; 1070.55,787.4 1070.55,800 ccw(c1054.44,800) 1065.33,811.88 823.2,1033.95 cw(c844.49,1057.16) 812.99,1057.16 812.99,1481.76 cw(c844.49,1481.76) 833.88,1511.41 1034.16,1583.08 ccw(c1023.55,1612.73) 1055.04,1612.73 1055.04,1671.99 cw(c1086.54,1671.99) 1064.27,1694.26 1100.32,1730.31 ccw(c1078.05,1752.59) 1109.54,1752.59 J1.47@1109.54,1882.35
PS+_05: J1.46 J2.64 | length 1524.6
  Top Layer w5.91: 1145.9,653.54 1169.21,678.26 ccw(c1162.05,685.01) 1171.9,685.01 1171.9,750.85 ccw(c1162.05,750.85) 1171.65,753.06 1165.8,778.44 cw(c1175.39,780.65) 1165.55,780.65 1165.55,787.4
  Top Layer w7.87: 1145.9,653.54 1133.73,640.64 ccw(c1140.89,633.89) 1131.04,633.89 1131.04,606.23 ccw(c1140.89,606.23) 1133.67,599.53 1175.92,554.01 cw(c1168.7,547.32) 1178.54,547.32 J2.64@1178.54,450 ; 1165.55,787.4 1165.55,802.08 ccw(c1134.06,802.08) 1164,811.84 1090.13,1038.55 cw(c1120.08,1048.31) 1088.58,1048.31 1088.58,1492.14 cw(c1120.08,1492.14) 1096.33,1512.83 1156.29,1581.66 ccw(c1132.55,1602.35) 1164.04,1602.35 1164.04,1671.99 cw(c1195.54,1671.99) 1173.27,1694.26 1209.32,1730.31 ccw(c1187.05,1752.59) 1218.54,1752.59 J1.46@1218.54,1882.35
PS+_06: J1.45 J2.65 | length 1649.6
  Bottom Layer w5.91: 1240.9,653.54 1264.21,678.26 ccw(c1257.05,685.01) 1266.9,685.01 1266.9,750.85 ccw(c1257.05,750.85) 1266.65,753.06 1260.8,778.44 cw(c1270.39,780.65) 1260.55,780.65 1260.55,787.4
  Bottom Layer w7.87: 1240.9,653.54 1228.73,640.64 ccw(c1235.89,633.89) 1226.04,633.89 1226.04,606.23 ccw(c1235.89,606.23) 1228.67,599.53 1270.92,554.01 cw(c1263.7,547.32) 1273.54,547.32 J2.65@1273.54,450 ; 1260.55,787.4 1260.55,800 ccw(c1238.78,800) 1256.38,812.82 1094.62,1035.02 cw(c1120.08,1053.56) 1088.58,1053.56 1088.58,1483.93 cw(c1120.08,1483.93) 1106.69,1512.44 1254.93,1582.05 ccw(c1241.55,1610.56) 1273.04,1610.56 1273.04,1671.99 cw(c1304.54,1671.99) 1282.27,1694.26 1318.32,1730.31 ccw(c1296.05,1752.59) 1327.54,1752.59 J1.45@1327.54,1882.35
PS+_07: J1.44 J2.66 | length 1488.1
  Top Layer w5.91: 1335.9,653.54 1359.21,678.26 ccw(c1352.05,685.01) 1361.9,685.01 1361.9,750.85 ccw(c1352.05,750.85) 1361.65,753.06 1355.8,778.44 cw(c1365.39,780.65) 1355.55,780.65 1355.55,787.4
  Top Layer w7.87: 1335.9,653.54 1323.73,640.64 ccw(c1330.89,633.89) 1321.04,633.89 1321.04,606.23 ccw(c1330.89,606.23) 1323.67,599.53 1365.92,554.01 cw(c1358.7,547.32) 1368.54,547.32 J2.66@1368.54,450 ; 1355.55,787.4 1355.55,806.51 cw(c1387.05,806.51) 1355.57,807.66 1364.15,1042.73 ccw(c1332.68,1043.88) 1364.17,1043.88 1364.17,1500.9 cw(c1395.67,1500.9) 1364.75,1506.92 1380.46,1587.57 ccw(c1349.55,1593.59) 1381.04,1593.59 1381.04,1671.99 cw(c1412.54,1671.99) 1390.27,1694.26 1426.32,1730.31 ccw(c1404.05,1752.59) 1435.54,1752.59 J1.44@1435.54,1882.35
PS+_08: J1.43 J2.67 | length 1562.3
  Bottom Layer w5.91: 1430.9,653.54 1454.21,678.26 ccw(c1447.05,685.01) 1456.9,685.01 1456.9,750.85 ccw(c1447.05,750.85) 1456.65,753.06 1450.8,778.44 cw(c1460.39,780.65) 1450.55,780.65 1450.55,787.4
  Bottom Layer w7.87: 1430.9,653.54 1418.73,640.64 ccw(c1425.89,633.89) 1416.04,633.89 1416.04,606.23 ccw(c1425.89,606.23) 1418.67,599.53 1460.92,554.01 cw(c1453.7,547.32) 1463.54,547.32 J2.67@1463.54,450 ; 1450.55,787.4 1450.55,801.51 ccw(c1419.06,801.51) 1448.64,812.33 1366.09,1038.07 cw(c1395.67,1048.88) 1364.17,1048.88 1364.17,1487.38 cw(c1395.67,1487.38) 1377.81,1513.32 1476.4,1581.16 ccw(c1458.55,1607.11) 1490.04,1607.11 1490.04,1671.99 cw(c1521.54,1671.99) 1499.27,1694.26 1535.32,1730.31 ccw(c1513.05,1752.59) 1544.54,1752.59 J1.43@1544.54,1882.35